# Altium PCB Sampler.PCBDOC (part 8 of 11)
Units mm, origin at the board's own origin, x right, y up, seen from the top; angles counter-clockwise.
Board outline 222.9 x 100 mm, 4 copper layers (L1, P2, L3, L4), stack 1.6 mm thick; 754 components, 442 nets, 2347 pads, 1230 vias.
Unrouted connection lines stored in the file: 10.
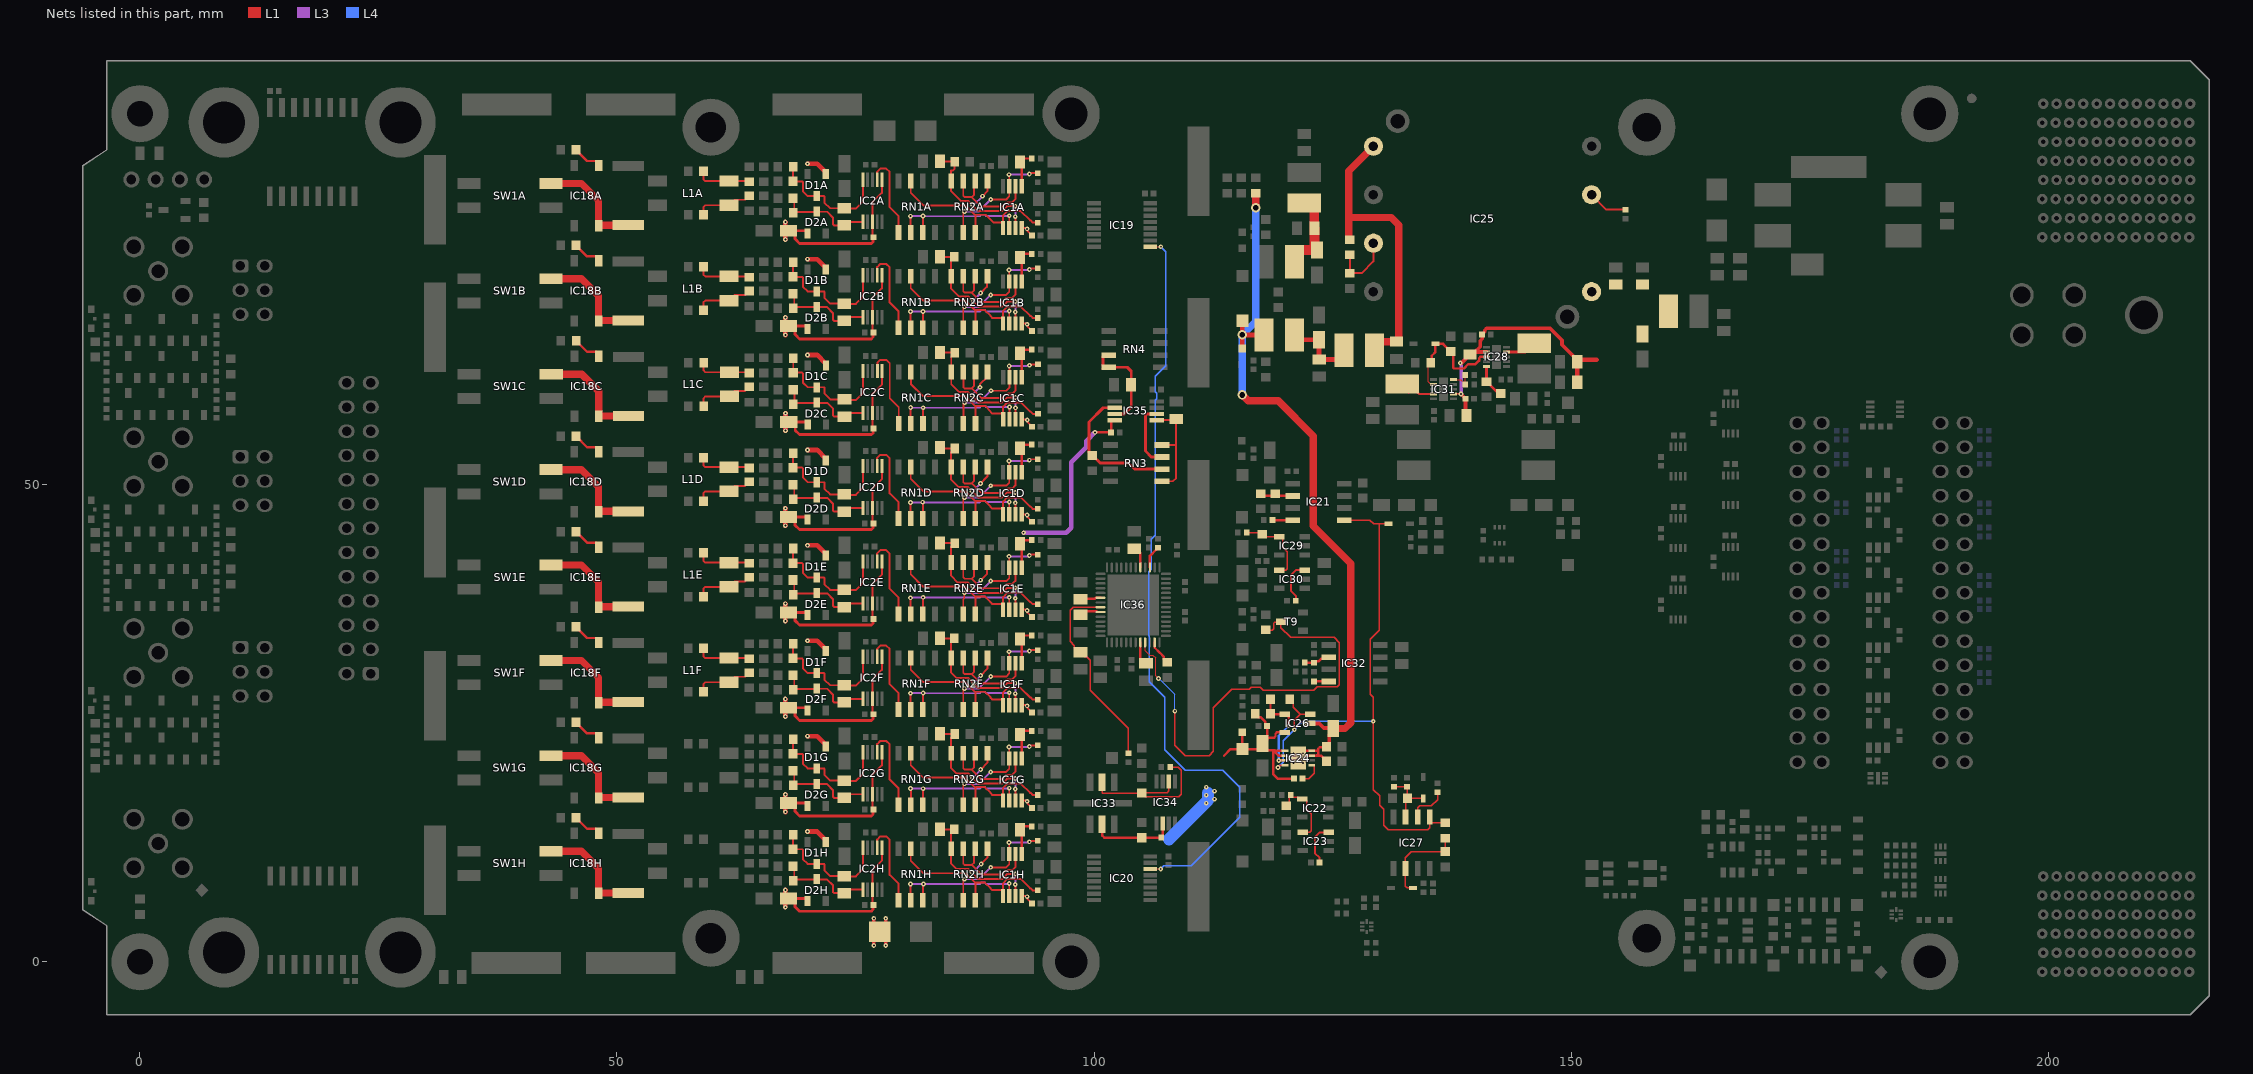
[diagram p9: the nets of this part, all layers, seen from the top]

## Via types
v1: diameter 0.5, hole 0.2, L1 to L4, tented both sides, 1208 vias
v2: diameter 1, hole 0.6, L1 to L4, tented both sides, 16 vias
v3: diameter 0.6, hole 0.3, L1 to L4, tented both sides, 6 vias

## Nets (pads, with @x,y where several pads share a name; then routed paths per layer and width w, separated by ;. In a path a pad name is that pad's centre, name@x,y a point inside that pad or via, vN(x,y) a via of type N, cw(c..) or ccw(c..) an arc to the next point about the centre after c; other vN are vias at no path point) (continued)
N12V0A: C10A.2 C10B.2 C10C.2 C10D.2 C10E.2 C10F.2 C10G.2 C10H.2 C11A.2 C11B.2 C11C.2 C11D.2 C11E.2 C11F.2 C11G.2 C11H.2 C14A.2 C14B.2 C14C.2 C14D.2 C14E.2 C14F.2 C14G.2 C14H.2 C46.2 C63.2 C64.2 C105.2 D1A.1 D1B.1 D1C.1 D1D.1 D1E.1 D1F.1 D1G.1 D1H.1 D2A.1 D2B.1 D2C.1 D2D.1 D2E.1 D2F.1 D2G.1 D2H.1 D6.2 IC1A.4 IC1B.4 IC1C.4 IC1D.4 IC1E.4 IC1F.4 IC1G.4 IC1H.4 IC2A.3 IC2A.6 IC2B.3 IC2B.6 IC2C.3 IC2C.6 IC2D.3 IC2D.6 IC2E.3 IC2E.6 IC2F.3 IC2F.6 IC2G.3 IC2G.6 IC2H.3 IC2H.6 IC24.1 IC24.2 IC26.5 IC35.4 LD12.1 R61.2 TP9.1 | length 245
  L1 w0.203: D2H.1@69.709,6.63 D2H.1@69.983,6.356 ; D2G.1@69.709,16.63 D2G.1@69.983,16.356 ; D2F.1@69.709,26.63 D2F.1@69.983,26.356 ; D2E.1@69.709,36.63 D2E.1@69.983,36.356 ; D2D.1@69.709,46.63 D2D.1@69.983,46.356 ; D2B.1@69.709,66.63 D2B.1@69.983,66.356 ; D2A.1@69.709,76.63 D2A.1@69.983,76.356 D2A.1@69.944,76.395 ; D2C.1@69.722,56.586 D2C.1@69.996,56.312 ; D1G.1@71.883,22.641 D1G.1@71.883,22.754 ; D1F.1@71.883,32.568 D1F.1@71.883,32.641 ; D1F.1@71.883,32.754 D1F.1@71.883,32.641 ; D1E.1@71.883,42.568 D1E.1@71.883,42.641 ; D1E.1@71.883,42.754 D1E.1@71.883,42.641 ; D1D.1@71.883,52.568 D1D.1@71.883,52.641 ; D1D.1@71.883,52.754 D1D.1@71.883,52.641 ; D1B.1@71.883,72.568 D1B.1@71.883,72.641 ; D1B.1@71.883,72.754 D1B.1@71.883,72.641 ; D1A.1@71.883,82.568 D1A.1@71.883,82.641 ; D1A.1@71.883,82.754 D1A.1@71.883,82.641 ; D1C.1@71.896,62.524 D1C.1@71.896,62.597 ; D1C.1@71.896,62.71 D1C.1@71.896,62.597 ; D1F.1@71.955,32.688 71.896,32.628 D1F.1@71.883,32.641 ; D1E.1@71.955,42.688 71.896,42.628 D1E.1@71.883,42.641 ; D1D.1@71.955,52.688 71.896,52.628 D1D.1@71.883,52.641 ; D1B.1@71.955,72.688 71.896,72.628 D1B.1@71.883,72.641 ; D1A.1@71.955,82.688 71.896,82.628 D1A.1@71.883,82.641 ; D1C.1@71.968,62.644 71.908,62.585 D1C.1@71.896,62.597 ; C10A.2@76.775,76.038 76.775,79.596 77.775,80.596 IC2A.6@77.775,81.967 ; C10H.2@76.865,5.948 76.775,6.038 76.775,9.596 77.775,10.596 IC2H.6@77.775,11.967 ; C10G.2@76.865,15.948 76.775,16.038 76.775,19.596 77.775,20.596 IC2G.6@77.775,21.967 ; C10F.2@76.865,25.948 76.775,26.038 76.775,29.596 77.775,30.596 IC2F.6@77.775,31.967 ; C10E.2@76.865,35.948 76.775,36.038 IC2E.3@76.775,37.567 76.775,39.596 77.775,40.596 IC2E.6@77.775,41.967 ; C10D.2@76.865,45.948 76.775,46.038 76.775,49.596 77.775,50.596 IC2D.6@77.775,51.967 ; C10B.2@76.865,65.948 76.775,66.038 76.775,69.596 77.775,70.596 IC2B.6@77.775,71.967 ; C10C.2@76.878,55.904 76.788,55.994 76.788,59.553 77.788,60.553 IC2C.6@77.788,61.923 ; IC1H.4@92.419,6.909 92.915,6.909 v1(92.994,6.83) 92.994,6.63 C14H.2@93.494,6.13 ; IC1G.4@92.419,16.909 92.915,16.909 v1(92.994,16.83) 92.994,16.63 C14G.2@93.494,16.13 ; IC1F.4@92.419,26.909 92.915,26.909 v1(92.994,26.83) 92.994,26.63 C14F.2@93.494,26.13 ; IC1E.4@92.419,36.909 92.915,36.909 v1(92.994,36.83) 92.994,36.63 C14E.2@93.494,36.13 ; IC1D.4@92.419,46.909 92.915,46.909 v1(92.994,46.83) 92.994,46.63 C14D.2@93.494,46.13 ; IC1B.4@92.419,66.909 92.915,66.909 v1(92.994,66.83) 92.994,66.63 C14B.2@93.494,66.13 ; IC1A.4@92.419,76.909 92.915,76.909 v1(92.994,76.83) 92.994,76.63 C14A.2@93.494,76.13 ; IC1C.4@92.432,56.865 92.928,56.865 v1(93.007,56.786) 93.007,56.586 C14C.2@93.507,56.086
  L1 w0.25: v1(100.1,55.5) C105.2@101.8,55.5 101.8,56.675 101.9,56.775 IC35.4@102.175,56.775 ; 113.625,21.6 114.315,22.29 TP9.1@115.55,22.29 ; LD12.1@115.55,24.075 TP9.1@115.55,22.29 ; R61.2@116.9,26.025 116.9,25.975 117.225,25.65 117.275,25.65 117.466,25.65 117.965,25.151 117.965,24.885 C64.2@118.15,24.7 C63.2@118.15,23.348 ; IC26.5@119.987,24.047 119.171,24.047 119.025,23.9 119.025,23.644 118.879,23.498 118.3,23.498 C63.2@118.15,23.348 ; IC24.2@120.012,21.61 119.571,21.61 119.569,21.612 119.338,21.612 119.05,21.9 119.05,22.054 ; IC24.1@120.012,22.11 119.106,22.11 119.05,22.054 ; C46.2@120.962,19.2 119.25,19.2 118.775,19.675 118.775,22.137 118.75,22.162 ; TP9.1@115.55,22.29 117.3,22.29 C63.2@117.8,22.79 ; C63.2@117.8,22.79 117.8,22.662 118.3,22.162 118.75,22.162 ; C63.2@117.8,22.79 117.8,22.9 118.15,23.25 C63.2@118.15,23.348 ; 118.75,22.162 118.941,22.162 119.05,22.054
  L1 w0.3: C11A.2@67.994,76.63 C11A.2@68.2,76.63 ; C11H.2@68.2,6.63 D2H.1@69.709,6.63 ; C11G.2@68.2,16.63 D2G.1@69.709,16.63 ; C11F.2@68.2,26.63 D2F.1@69.709,26.63 ; C11E.2@68.2,36.63 D2E.1@69.709,36.63 ; C11D.2@68.2,46.63 D2D.1@69.709,46.63 ; C11B.2@68.2,66.63 D2B.1@69.709,66.63 ; C11H.2@68.202,6.63 68.677,6.155 68.677,5.751 69.128,5.3 76.674,5.3 76.85,5.476 C10H.2@76.85,5.933 ; C11G.2@68.202,16.63 68.677,16.155 68.677,15.751 69.128,15.3 76.674,15.3 76.85,15.476 C10G.2@76.85,15.933 ; C11F.2@68.202,26.63 68.677,26.155 68.677,25.751 69.128,25.3 76.674,25.3 76.85,25.476 C10F.2@76.85,25.933 ; C11E.2@68.202,36.63 68.677,36.155 68.677,35.751 69.128,35.3 76.674,35.3 76.85,35.476 C10E.2@76.85,35.933 ; C11D.2@68.202,46.63 68.677,46.155 68.677,45.751 69.128,45.3 76.674,45.3 76.85,45.476 C10D.2@76.85,45.933 ; C11B.2@68.202,66.63 68.677,66.155 68.677,65.751 69.128,65.3 76.674,65.3 76.85,65.476 C10B.2@76.85,65.933 ; C11C.2@68.213,56.586 D2C.1@69.722,56.586 ; C11C.2@68.214,56.586 68.689,56.111 68.689,55.708 69.141,55.256 76.687,55.256 76.863,55.432 C10C.2@76.863,55.889 ; D2A.1@69.709,76.63 C11A.2@68.2,76.63 ; C10A.2@76.865,75.948 76.85,75.933 76.85,75.476 76.674,75.3 69.128,75.3 68.677,75.751 68.677,76.155 68.202,76.63 C11A.2@68.2,76.63
  L1 w0.35: v1(76.919,1.7) D6.2@76.919,2.605 ; D6.2@76.919,3.655 v1(76.919,4.56) ; v1(78.169,1.7) D6.2@78.169,2.605 ; D6.2@78.169,3.655 v1(78.169,4.56)
  L1 w0.5: v1(69.968,13.653) 70.984,13.653 71.883,12.754 D1H.1@71.883,12.641 ; v1(69.968,23.653) 70.984,23.653 D1G.1@71.883,22.754 ; v1(69.968,33.653) 70.984,33.653 D1F.1@71.883,32.754 ; v1(69.968,43.653) 70.984,43.653 D1E.1@71.883,42.754 ; v1(69.968,53.653) 70.984,53.653 D1D.1@71.883,52.754 ; v1(69.968,73.653) 70.984,73.653 D1B.1@71.883,72.754 ; v1(69.968,83.653) 70.984,83.653 D1A.1@71.883,82.754 ; v1(69.981,63.609) 70.997,63.609 D1C.1@71.896,62.71
  L1 w0.508: v1@67.635,7.54 v1@67.653,7.522 ; v1@67.635,15.738 v1@67.653,15.72 ; v1@67.635,17.54 v1@67.653,17.522 ; v1@67.635,25.738 v1@67.653,25.72 ; v1@67.635,27.54 v1@67.653,27.522 ; v1@67.635,35.738 v1@67.653,35.72 ; v1@67.635,37.54 v1@67.653,37.522 ; v1@67.635,45.738 v1@67.653,45.72 ; v1@67.635,47.54 v1@67.653,47.522 ; v1@67.635,65.738 v1@67.653,65.72 ; v1@67.635,67.54 v1@67.653,67.522 ; v1@67.635,75.738 v1@67.653,75.72 ; v1@67.635,77.54 v1@67.653,77.522 ; v1@67.644,5.738 67.644,6.63 v1@67.644,7.522 ; v1@67.644,15.738 67.644,16.63 v1@67.644,17.522 ; v1@67.644,25.738 67.644,26.63 v1@67.644,27.522 ; v1@67.644,35.738 67.644,36.63 v1@67.644,37.522 ; v1@67.644,45.738 67.644,46.63 v1@67.644,47.522 ; v1@67.644,65.738 67.644,66.63 v1@67.644,67.522 ; v1@67.644,75.738 67.644,76.63 v1@67.644,77.522 ; v1@67.647,55.694 v1@67.666,55.676 ; v1@67.647,57.496 v1@67.666,57.478 ; v1@67.657,55.694 67.657,56.586 v1@67.657,57.478
  L3 w0.5: v1(92.625,44.975) 97.089,44.975 97.625,45.511 97.625,52.375 99.225,53.975 99.225,54.625 v1(100.1,55.5)
  L4 w1.27: 107.85,12.85 111.95,16.95 111.95,17.7
  other v1: 67.644,5.72 67.644,7.54 67.644,15.72 111.763,16.632 112.625,17.05 111.763,17.469 67.644,17.54 112.625,17.887 111.763,18.306 67.644,25.72 67.644,27.54 67.644,35.72 67.644,37.54 67.644,45.72 67.644,47.54 67.657,55.676 67.657,57.496 67.644,65.72 67.644,67.54 67.644,75.72 67.644,77.54
N13V0: C26.2 C61.2 C62.2 IC24.7 IC24.8 IC24.9 IC26.2 L6.2 LD13.1 R42.2 TP20.1 | length 80.4
  L1 w0.25: IC24.9@122.114,21.61 IC24.7@122.812,21.61 123.335,21.61 ; IC24.9@122.114,22.11 IC24.8@122.812,22.11 123.51,22.11 ; C26.2@124.378,21.01 124.378,21.035 123.803,21.61 123.335,21.61 ; C61.2@124.378,22.535 124.343,22.5 123.675,22.5 123.51,22.335 123.51,22.11 ; 123.335,21.61 123.51,21.785 123.51,22.11
  L1 w0.4: IC26.2@122.687,24.997 123.615,24.997 124.087,24.525 124.653,24.525 124.777,24.401 124.777,24.159 C62.2@125.078,24.46 125.078,24.185 124.652,23.759 124.652,22.809 C61.2@124.378,22.535
  L1 w0.5: LD13.1@115.55,64.285 v2(115.55,65.725) TP20.1@115.55,66.895
  L1 w0.508: v2(115.55,65.725) 115.575,65.7 L6.2@117.7,65.7
  L1 w0.762: v2(115.55,59.425) 116.176,58.799 119.302,58.799 122.981,55.12 122.981,45.684 126.905,41.76 126.905,25.055 126.31,24.46 C62.2@125.078,24.46 ; R42.2@116.944,80.58 116.944,79.081 v2@116.975,79.05
  L4 w0.762: v2(115.55,59.425) v2(115.55,65.725) 116.944,67.119 v2(116.944,79.055)
  other v1: 120.912,20.86 121.912,20.86 120.912,21.86 121.912,21.86
N13V0S: C58.2 IC25.4 L5.1 R58.1 | length 32
  L1 w0.762: R58.1@126.694,75.68 R58.1@126.738,75.724 ; R58.1@126.813,75.699 126.763,75.699 R58.1@126.738,75.724 ; R58.1@126.813,75.749 126.763,75.749 R58.1@126.738,75.724 ; IC25.4@129.294,85.485 126.694,82.885 126.694,78.33 ; L5.1@129.4,64.1 129.4,64.381 130.019,65 C58.2@131.7,65 131.944,65.244 131.944,77.235 131.149,78.03 126.994,78.03 126.694,78.33 ; 126.694,78.33 126.694,75.768 R58.1@126.738,75.724
NetC1A_2: C1A.2 C2A.2 D1A.3 IC2A.10 R3A.2 | length 13.5
  L1 w0.203: R3A.2@68.462,83.322 C1A.2@68.462,81.798 69.403,81.798 69.483,81.718 69.483,80.768 69.983,80.268 D1A.3@70.933,80.268 71.702,80.268 71.746,80.224 71.746,79.589 72.345,78.99 C2A.2@73.829,78.99 73.865,78.954 75.048,78.954 75.775,79.681 IC2A.10@75.775,81.967
NetC1B_2: C1B.2 C2B.2 D1B.3 IC2B.10 R3B.2 | length 13.5
  L1 w0.203: R3B.2@68.462,73.322 C1B.2@68.462,71.798 69.403,71.798 69.483,71.718 69.483,70.768 69.983,70.268 D1B.3@70.933,70.268 71.702,70.268 71.746,70.224 71.746,69.589 72.345,68.99 C2B.2@73.829,68.99 73.865,68.954 75.048,68.954 75.775,69.681 IC2B.10@75.775,71.967
NetC1C_2: C1C.2 C2C.2 D1C.3 IC2C.10 R3C.2 | length 13.5
  L1 w0.203: R3C.2@68.475,63.278 C1C.2@68.475,61.754 69.416,61.754 69.496,61.674 69.496,60.724 69.996,60.224 D1C.3@70.946,60.224 71.715,60.224 71.759,60.18 71.759,59.545 72.357,58.947 C2C.2@73.841,58.947 73.878,58.91 75.061,58.91 75.788,59.637 IC2C.10@75.788,61.923
NetC1D_2: C1D.2 C2D.2 D1D.3 IC2D.10 R3D.2 | length 13.5
  L1 w0.203: R3D.2@68.462,53.322 C1D.2@68.462,51.798 69.403,51.798 69.483,51.718 69.483,50.768 69.983,50.268 D1D.3@70.933,50.268 71.702,50.268 71.746,50.224 71.746,49.589 72.345,48.99 C2D.2@73.829,48.99 73.865,48.954 75.048,48.954 75.775,49.681 IC2D.10@75.775,51.967
NetC1E_2: C1E.2 C2E.2 D1E.3 IC2E.10 R3E.2 | length 13.5
  L1 w0.203: R3E.2@68.462,43.322 C1E.2@68.462,41.798 69.403,41.798 69.483,41.718 69.483,40.768 69.983,40.268 D1E.3@70.933,40.268 71.702,40.268 71.746,40.224 71.746,39.589 72.345,38.99 C2E.2@73.829,38.99 73.865,38.954 75.048,38.954 75.775,39.681 IC2E.10@75.775,41.967
NetC1F_2: C1F.2 C2F.2 D1F.3 IC2F.10 R3F.2 | length 13.5
  L1 w0.203: R3F.2@68.462,33.322 C1F.2@68.462,31.798 69.403,31.798 69.483,31.718 69.483,30.768 69.983,30.268 D1F.3@70.933,30.268 71.702,30.268 71.746,30.224 71.746,29.589 72.345,28.99 C2F.2@73.829,28.99 73.865,28.954 75.048,28.954 75.775,29.681 IC2F.10@75.775,31.967
NetC1G_2: C1G.2 C2G.2 D1G.3 IC2G.10 R3G.2 | length 13.5
  L1 w0.203: R3G.2@68.462,23.322 C1G.2@68.462,21.798 69.403,21.798 69.483,21.718 69.483,20.768 69.983,20.268 D1G.3@70.933,20.268 71.702,20.268 71.746,20.224 71.746,19.589 72.345,18.99 C2G.2@73.829,18.99 73.865,18.954 75.048,18.954 75.775,19.681 IC2G.10@75.775,21.967
NetC1H_2: C1H.2 C2H.2 D1H.3 IC2H.10 R3H.2 | length 13.5
  L1 w0.203: R3H.2@68.462,13.322 C1H.2@68.462,11.798 69.403,11.798 69.483,11.718 69.483,10.768 69.983,10.268 D1H.3@70.933,10.268 71.702,10.268 71.746,10.224 71.746,9.589 72.345,8.99 C2H.2@73.829,8.99 73.865,8.954 75.048,8.954 75.775,9.681 IC2H.10@75.775,11.967
NetC2A_1: C2A.1 C5A.2 D2A.3 IC2A.1 R10A.2 | length 9.7
  L1 w0.203: C5A.2@68.582,79.9 68.582,78.616 70.893,78.616 D2A.3@70.899,78.622 ; D2A.3@70.933,78.656 D2A.3@70.899,78.622 ; IC2A.1@75.775,77.567 74.205,77.567 C2A.1@73.829,77.19 72.749,77.19 72.642,77.298 72.642,78.004 72.024,78.622 D2A.3@70.899,78.622
NetC2B_1: C2B.1 C5B.2 D2B.3 IC2B.1 R10B.2 | length 9.7
  L1 w0.203: C5B.2@68.582,69.9 68.582,68.616 70.893,68.616 D2B.3@70.899,68.622 ; D2B.3@70.933,68.656 D2B.3@70.899,68.622 ; IC2B.1@75.775,67.567 74.205,67.567 C2B.1@73.829,67.19 72.749,67.19 72.642,67.298 72.642,68.004 72.024,68.622 D2B.3@70.899,68.622
NetC2C_1: C2C.1 C5C.2 D2C.3 IC2C.1 R10C.2 | length 9.7
  L1 w0.203: C5C.2@68.595,59.856 68.595,58.572 70.906,58.572 D2C.3@70.912,58.578 ; D2C.3@70.946,58.612 D2C.3@70.912,58.578 ; IC2C.1@75.788,57.523 74.218,57.523 C2C.1@73.841,57.147 72.762,57.147 72.654,57.254 72.654,57.96 72.036,58.578 D2C.3@70.912,58.578
NetC2D_1: C2D.1 C5D.2 D2D.3 IC2D.1 R10D.2 | length 9.7
  L1 w0.203: C5D.2@68.582,49.9 68.582,48.616 70.893,48.616 D2D.3@70.899,48.622 ; D2D.3@70.933,48.656 D2D.3@70.899,48.622 ; IC2D.1@75.775,47.567 74.205,47.567 C2D.1@73.829,47.19 72.749,47.19 72.642,47.298 72.642,48.004 72.024,48.622 D2D.3@70.899,48.622
NetC2E_1: C2E.1 C5E.2 D2E.3 IC2E.1 R10E.2 | length 9.7
  L1 w0.203: C5E.2@68.582,39.9 68.582,38.616 70.893,38.616 D2E.3@70.899,38.622 ; D2E.3@70.933,38.656 D2E.3@70.899,38.622 ; IC2E.1@75.775,37.567 74.205,37.567 C2E.1@73.829,37.19 72.749,37.19 72.642,37.298 72.642,38.004 72.024,38.622 D2E.3@70.899,38.622
NetC2F_1: C2F.1 C5F.2 D2F.3 IC2F.1 R10F.2 | length 9.7
  L1 w0.203: C5F.2@68.582,29.9 68.582,28.616 70.893,28.616 D2F.3@70.899,28.622 ; D2F.3@70.933,28.656 D2F.3@70.899,28.622 ; IC2F.1@75.775,27.567 74.205,27.567 C2F.1@73.829,27.19 72.749,27.19 72.642,27.298 72.642,28.004 72.024,28.622 D2F.3@70.899,28.622
NetC2G_1: C2G.1 C5G.2 D2G.3 IC2G.1 R10G.2 | length 9.7
  L1 w0.203: C5G.2@68.582,19.9 68.582,18.616 70.893,18.616 D2G.3@70.899,18.622 ; D2G.3@70.933,18.656 D2G.3@70.899,18.622 ; IC2G.1@75.775,17.567 74.205,17.567 C2G.1@73.829,17.19 72.749,17.19 72.642,17.298 72.642,18.004 72.024,18.622 D2G.3@70.899,18.622
NetC2H_1: C2H.1 C5H.2 D2H.3 IC2H.1 R10H.2 | length 9.7
  L1 w0.203: C5H.2@68.582,9.9 68.582,8.616 70.893,8.616 D2H.3@70.899,8.622 ; D2H.3@70.933,8.656 D2H.3@70.899,8.622 ; IC2H.1@75.775,7.567 74.205,7.567 C2H.1@73.829,7.19 72.749,7.19 72.642,7.298 72.642,8.004 72.024,8.622 D2H.3@70.899,8.622
NetC3A_2: C3A.2 IC1A.3 R7A.2 RN2A.1 RN2A.4 | length 18.6
  L1 w0.203: C3A.2@83.869,83.655 C3A.2@83.869,83.905 85.369,83.905 R7A.2@85.394,83.88 85.394,83.105 85.239,82.95 85.024,82.95 RN2A.4@85.024,81.855 85.024,80.775 86.044,79.755 86.794,79.755 v1@87.194,79.355 ; v1(87.244,79.355) v1@87.194,79.355 ; v1(88.319,80.255) 88.834,80.77 RN2A.1@88.834,81.855 ; v1(91.744,79.205) 90.894,79.205 90.369,78.68 87.869,78.68 v1@87.194,79.355 ; v1(91.748,78.109) 91.769,78.088 IC1A.3@91.769,76.909
  L3 w0.203: v1(87.244,79.355) 87.419,79.355 v1(88.319,80.255) ; v1(91.744,79.205) 91.748,79.201 v1(91.748,78.109)
NetC3B_2: C3B.2 IC1B.3 R7B.2 RN2B.1 RN2B.4 | length 18.2
  L1 w0.203: C3B.2@83.869,73.905 83.894,73.88 85.344,73.88 85.024,73.56 RN2B.4@85.024,71.855 85.024,70.555 85.824,69.755 86.794,69.755 v1(87.332,69.217) 87.869,68.68 90.369,68.68 90.894,69.205 v1(91.744,69.205) ; v1(88.119,70.105) 88.769,70.755 88.769,71.79 RN2B.1@88.834,71.855 ; v1(91.748,68.109) 91.769,68.088 IC1B.3@91.769,66.909
  L3 w0.203: v1(87.332,69.217) 87.332,69.318 v1(88.119,70.105) ; v1(91.744,69.205) 91.748,69.201 v1(91.748,68.109)
NetC3C_2: C3C.2 IC1C.3 R7C.2 RN2C.1 RN2C.4 | length 18.1
  L1 w0.203: C3C.2@83.882,63.861 83.888,63.855 R7C.2@85.394,63.855 85.037,63.498 RN2C.4@85.037,61.812 85.037,60.53 85.856,59.711 86.807,59.711 87.166,59.352 87.882,58.636 90.382,58.636 90.907,59.161 v1(91.757,59.161) ; v1(88.044,60.23) 88.044,60.53 88.847,61.333 RN2C.1@88.847,61.812 ; v1(91.761,58.065) 91.782,58.045 IC1C.3@91.782,56.865
  L3 w0.203: v1(87.194,59.38) v1(88.044,60.23) ; v1(91.757,59.161) 91.761,59.157 v1(91.761,58.065)
NetC3D_2: C3D.2 IC1D.3 R7D.2 RN2D.1 RN2D.4 | length 18.2
  L1 w0.203: C3D.2@83.869,53.905 83.969,53.805 R7D.2@85.394,53.805 85.024,53.435 RN2D.4@85.024,51.855 85.024,50.546 85.816,49.755 86.794,49.755 v1(87.219,49.33) 87.869,48.68 90.369,48.68 90.894,49.205 v1(91.744,49.205) ; v1(88.094,50.13) 88.834,50.87 RN2D.1@88.834,51.855 ; v1(91.748,48.109) 91.769,48.088 IC1D.3@91.769,46.909
  L3 w0.203: v1(87.219,49.33) 87.294,49.33 v1(88.094,50.13) ; v1(91.744,49.205) 91.748,49.201 v1(91.748,48.109)
NetC3E_2: C3E.2 IC1E.3 R7E.2 RN2E.1 RN2E.4 | length 18.3
  L1 w0.203: C3E.2@83.869,43.905 83.894,43.88 R7E.2@85.394,43.88 85.024,43.51 RN2E.4@85.024,41.855 85.024,40.467 85.737,39.755 86.794,39.755 87.257,39.292 87.869,38.68 90.369,38.68 90.894,39.205 v1(91.744,39.205) ; v1(88.119,40.005) 88.794,40.68 88.794,41.815 RN2E.1@88.834,41.855 ; v1(91.748,38.109) 91.769,38.088 IC1E.3@91.769,36.909
  L3 w0.203: v1(87.294,39.33) 87.444,39.33 v1(88.119,40.005) ; v1(91.744,39.205) 91.748,39.201 v1(91.748,38.109)
NetC3F_2: C3F.2 IC1F.3 R7F.2 RN2F.1 RN2F.4 | length 18.4
  L1 w0.203: C3F.2@83.869,33.905 R7F.2@85.369,33.905 85.024,33.56 RN2F.4@85.024,31.855 85.024,30.3 85.569,29.755 86.794,29.755 87.412,29.137 87.869,28.68 90.369,28.68 90.894,29.205 v1(91.744,29.205) ; v1(88.119,30.005) 88.834,30.72 RN2F.1@88.834,31.855 ; v1(91.748,28.109) 91.769,28.088 IC1F.3@91.769,26.909
  L3 w0.203: v1(87.429,29.155) 87.429,29.315 v1(88.119,30.005) ; v1(91.744,29.205) 91.748,29.201 v1(91.748,28.109)
NetC3G_2: C3G.2 IC1G.3 R7G.2 RN2G.1 RN2G.4 | length 18.4
  L1 w0.203: C3G.2@83.869,23.905 83.894,23.88 R7G.2@85.394,23.88 85.024,23.51 RN2G.4@85.024,21.855 85.024,20.3 85.569,19.755 86.794,19.755 v1(87.244,19.305) 87.869,18.68 90.369,18.68 90.894,19.205 v1(91.744,19.205) ; v1(88.119,20.155) 88.834,20.87 RN2G.1@88.834,21.855 ; v1(91.748,18.109) 91.769,18.088 IC1G.3@91.769,16.909
  L3 w0.203: v1(87.244,19.305) 87.269,19.305 v1(88.119,20.155) ; v1(91.744,19.205) 91.748,19.201 v1(91.748,18.109)
NetC3H_2: C3H.2 IC1H.3 R7H.2 RN2H.1 RN2H.4 | length 18.3
  L1 w0.203: C3H.2@83.894,13.88 R7H.2@85.369,13.88 85.024,13.535 RN2H.4@85.024,11.855 85.024,10.3 85.569,9.755 86.794,9.755 87.169,9.38 87.869,8.68 90.369,8.68 90.894,9.205 v1(91.744,9.205) ; v1(88.169,10.255) 88.834,10.92 RN2H.1@88.834,11.855 ; v1(91.748,8.109) 91.769,8.088 IC1H.3@91.769,6.909
  L3 w0.203: v1(87.194,9.405) 87.319,9.405 v1(88.169,10.255) ; v1(91.744,9.205) 91.748,9.201 v1(91.748,8.109)
NetC12A_2: C12A.2 IC1A.5 R13A.2 | length 4
  L1 w0.254: IC1A.5@92.419,81.309 92.419,83.655 C12A.2@92.244,83.83 92.619,84.205 R13A.2@93.474,84.205
NetC12B_2: C12B.2 IC1B.5 R13B.2 | length 4
  L1 w0.254: IC1B.5@92.419,71.309 92.419,73.655 C12B.2@92.244,73.83 92.619,74.205 R13B.2@93.474,74.205
NetC12C_2: C12C.2 IC1C.5 R13C.2 | length 4
  L1 w0.254: IC1C.5@92.432,61.265 92.432,63.611 C12C.2@92.257,63.786 92.632,64.161 R13C.2@93.487,64.161
NetC12D_2: C12D.2 IC1D.5 R13D.2 | length 4
  L1 w0.254: IC1D.5@92.419,51.309 92.419,53.655 C12D.2@92.244,53.83 92.619,54.205 R13D.2@93.474,54.205
NetC12E_2: C12E.2 IC1E.5 R13E.2 | length 4
  L1 w0.254: IC1E.5@92.419,41.309 92.419,43.655 C12E.2@92.244,43.83 92.619,44.205 R13E.2@93.474,44.205
NetC12F_2: C12F.2 IC1F.5 R13F.2 | length 4
  L1 w0.254: IC1F.5@92.419,31.309 92.419,33.655 C12F.2@92.244,33.83 92.619,34.205 R13F.2@93.474,34.205
NetC12G_2: C12G.2 IC1G.5 R13G.2 | length 4
  L1 w0.254: IC1G.5@92.419,21.309 92.419,23.655 C12G.2@92.244,23.83 92.619,24.205 R13G.2@93.474,24.205
NetC12H_2: C12H.2 IC1H.5 R13H.2 | length 4
  L1 w0.254: IC1H.5@92.419,11.309 92.419,13.655 C12H.2@92.244,13.83 92.619,14.205 R13H.2@93.474,14.205
NetC40_2: C40.2 IC21.4 | length 2.1
  L1 w0.25: C40.2@118.693,46.298 IC21.4@120.834,46.298
NetC42_1: C42.1 IC23.3 | length 4.6
  L1 w0.203: C42.1@123.644,10.369 123.644,10.885 123.144,11.385 123.144,13.069 123.644,13.569 IC23.3@124.594,13.569
NetC46_1: C46.1 IC24.5 | length 2.5
  L1 w0.152: C46.1@121.862,19.2 122.5,19.2 123.082,19.783 123.082,20.561 123.034,20.61 IC24.5@122.812,20.61
NetC49_2: C49.2 C50.1 L2.2 L3.1 | length 9
  L1 w1.016: L3.1@121,73.4 121,74.114 121.492,74.606 C50.1@123.387,74.606 123.387,74.881 123.111,75.157 123.111,76.863 C49.2@123.094,76.88 123.094,79.038 122.602,79.53 L2.2@122.144,79.53
NetC52_1: C52.1 C53.2 C54.2 C55.2 C56.2 C73.2 C74.2 C85.2 C86.2 IC25.1 IC28.2 IC31.2 L4.2 | length 29.1
  L1 w0.152: IC31.2@137.691,59.52 v1(138.481,59.52)
  L1 w0.381: v1(138.391,62.77) 138.523,62.77 C74.2@139.409,63.655 139.645,63.655 C74.2@139.904,63.915 ; v1(138.481,59.52) 138.481,59.48 C85.2@138.941,59.02 138.941,57.37 C86.2@139.041,57.27 ; IC28.2@141.142,63.915 C74.2@139.904,63.915 ; C55.2@150.653,62.901 150.653,63.076 149.06,64.669 149.06,65.139 147.802,66.397 141.149,66.397 140.963,66.211 140.963,66.042 C73.2@140.691,65.77 140.691,65.295 140.475,65.079 140.475,64.486 C74.2@139.904,63.915 ; L4.2@160.1,68.3 L4.2@160.2,68.2
  L1 w0.508: C56.2@150.653,60.742 C55.2@150.653,62.901 150.865,63.113 152.66,63.113
  L1 w0.762: IC25.1@152.154,70.245 IC25.1@152.489,70.245 ; C52.1@157.5,65.8 C52.1@157.5,66.075
  L3 w0.381: v1(138.391,62.77) 138.391,62.737 138.481,62.647 v1(138.481,59.52)
NetC59_2: C59.2 C60.2 L5.2 L6.1 | length 8.3
  L1 w0.508: L6.1@121,65.7 121,65.696 L6.1@121.746,64.95 ; L6.1@121.746,65.2 C60.2@123.6,65.2 C59.2@123.6,63.15 L5.2@125.454,63.15 ; L5.2@125.454,62.9 126.2,63.646 L5.2@126.2,64.1
NetC65_2: C65.2 D7.2 IC27.3 R59.1 R62.2 | length 6.3
  L1 w0.152: R59.1@131.425,18.35 R62.2@132.825,18.35 132.825,17.175 C65.2@132.875,17.125 ; IC27.3@132.651,15.192 132.651,16.901 C65.2@132.875,17.125 ; D7.2@134.511,17.102 134.488,17.125 C65.2@132.875,17.125
NetC66_2: C66.2 D8.2 IC28.3 IC31.7 R64.1 | length 13.1
  L1 w0.127: R64.1@135.291,62.795 135.316,62.77 135.378,62.77 135.441,62.77 135.378,62.707 135.05,62.379 135.05,60.791 135.235,60.606 135.504,60.606 IC31.7@135.591,60.52
  L1 w0.254: R64.1@135.291,62.795 135.353,62.857 135.398,62.902 135.398,63.527 135.788,63.917 135.788,64.763 D8.2@135.781,64.77 ; D8.2@135.788,64.77 136.591,64.77 C66.2@137.391,63.97 137.641,63.72 137.641,62.27 137.718,62.193 138.776,62.193 139.233,62.649 139.987,62.649 140.363,63.025 140.363,63.27 140.508,63.415 IC28.3@141.142,63.415
NetC72_2: C72.2 D9.2 IC27.6 R67.1 | length 9.7
  L1 w0.152: D9.2@133.426,7.742 132.833,7.742 132.65,7.925 132.65,10.925 133.275,11.55 C72.2@136.825,11.55 R67.1@136.825,12.967
NetC75_1: C75.1 IC30.3 | length 4.6
  L1 w0.203: C75.1@121.15,37.85 121.15,38.367 120.65,38.867 120.65,40.55 121.15,41.05 IC30.3@122.1,41.05
NetC82_2: C82.2 IC32.4 | length 1.5
  L1 w0.25: C82.2@123.046,29.389 IC32.4@124.596,29.389
NetC95_2: C95.2 IC36.22 | length 2.5
  L1 w0.254: IC36.22@104.864,33.49 104.864,31.703 105.287,31.28 C95.2@105.444,31.28
NetC96_2: C96.2 IC36.9 | length 2.3
  L1 w0.254: C96.2@98.569,36.366 98.964,36.761 100.248,36.761 100.344,36.665 IC36.9@100.689,36.665
NetC97_2: C97.2 IC36.6 | length 2.2
  L1 w0.254: C97.2@98.569,37.995 98.635,38.062 100.06,38.062 100.164,38.165 IC36.6@100.689,38.165
NetC98_2: C98.2 IC36.45 | length 2.2
  L1 w0.254: C98.2@104.415,43.321 104.864,42.871 IC36.45@104.864,41.34
NetC99_2: C99.2 IC36.8 R81.2 | length 21.1
  L1 w0.152: C99.2@98.569,32.442 99.043,31.968 99.232,31.968 99.591,31.609 99.591,28.484 103.6,24.475 R81.2@103.6,21.87 ; C99.2@98.65,32.525 98.345,32.525 97.954,32.916 97.954,33.121 97.493,33.582 97.493,36.853 97.806,37.165 IC36.8@100.689,37.165
NetC101_2: C101.2 IC33.2 IC34.2 R80.2 | length 9.2
  L1 w0.127: R80.2@107.194,13.093 107.114,13.013 R80.2@107.262,13.013
  L1 w0.25: IC33.2@100.844,14.434 100.844,13.24 101.071,13.013 R80.2@107.051,13.013 R80.2@107.114,13.013 ; R80.2@107.194,13.093 IC34.2@107.194,14.505
NetC102_2: C102.2 IC33.6 IC34.6 R82.1 | length 17.6
  L1 w0.152: IC33.6@100.844,18.834 100.844,17.745 100.933,17.656 104.939,17.656 C102.2@104.983,17.7 ; IC34.6@107.844,18.905 107.844,17.929 107.655,17.74 105.023,17.74 C102.2@104.983,17.7 ; R82.1@107.844,20.262 R82.1@107.991,20.409 108.816,20.409 109.125,20.1 109.125,17.55 108.876,17.301 105.382,17.301 105.045,17.638 C102.2@104.983,17.7
NetC103_2: C103.2 IC35.5 RN3.5 RN3.8 | length 11.2
  L1 w0.203: IC35.5@106.575,56.775 108.386,56.775 C103.2@108.611,57 ; RN3.5@107.125,50.37 108.272,50.37 108.611,50.709 108.611,54.18 ; RN3.8@107.125,54.18 108.611,54.18 ; C103.2@108.611,56.639 108.611,54.18
NetC106_2: C106.2 IC35.3 RN4.3 RN4.4 | length 10.8
  L1 w0.3: RN4.4@100.931,62.17 101.081,62.32 RN4.4@101.083,62.32 ; RN4.3@101.55,63.59 101.083,63.59 100.933,63.44 100.933,62.47 RN4.4@101.083,62.32 ; IC35.3@102.175,57.425 103.175,57.425 103.9,58.15 C106.2@103.9,60.5 103.9,61.9 103.48,62.32 RN4.4@101.55,62.32 RN4.4@101.083,62.32
NetD10_2: D10.2 IC21.5 IC24.4 IC26.3 IC27.1 R53.1 R67.2 | length 64.5
  L1 w0.152: v1(119.282,20.382) 119.51,20.61 IC24.4@120.012,20.61 ; R53.1@120.537,27.5 120.888,27.149 120.888,26.676 121.618,25.947 ; v1(121,24.322) 121,25.329 121.618,25.947 ; IC26.3@122.687,25.947 121.618,25.947 ; IC21.5@126.234,46.298 128.902,46.298 129.3,45.9 129.889,45.9 ; D10.2@130.86,45.9 129.889,45.9 ; IC27.1@135.191,15.36 IC27.1@135.191,15.192 IC27.1@135.191,14.791 ; R67.2@136.825,14.567 135.415,14.567 IC27.1@135.191,14.791 ; 129.889,45.9 129.889,34.739 128.975,33.825 128.975,28.05 129.274,27.751 v1(129.274,25.215) 129.274,18.057 129.949,17.383 129.949,16.426 130.375,16 130.375,14.3 130.818,13.857 135.007,13.857 135.191,14.041 IC27.1@135.191,14.791
  L4 w0.152: v1(119.282,20.382) 119.825,20.925 119.825,23.147 v1(121,24.322) 121.893,25.215 v1(129.274,25.215)
NetIC1A_1: IC1A.1 R6A.1 RN1A.7 RN2A.7 | length 19.7
  L1 w0.203: RN1A.7@80.788,81.857 80.788,80.611 82.105,79.294 86.541,79.294 87.564,78.27 ; RN2A.7@87.564,76.455 87.564,78.27 ; IC1A.1@90.469,76.909 IC1A.1@90.469,77.506 ; R6A.1@94.103,77.486 93.573,77.486 93.353,77.706 93.293,77.706 92.315,78.684 90.921,78.684 90.469,78.232 IC1A.1@90.469,77.506 ; 87.564,78.27 87.603,78.309 88.634,78.309 89.437,77.506 IC1A.1@90.469,77.506
NetIC1A_2: IC1A.2 RN1A.2 RN1A.3 | length 15.2
  L1 w0.203: v1(80.769,78.155) 80.769,76.477 RN1A.2@80.788,76.457 ; RN1A.3@82.058,76.457 82.058,78.169 v1(82.069,78.18) ; IC1A.2@91.119,76.909 v1(91.119,78.205)
  L3 w0.203: v1(80.769,78.155) 82.069,78.155 82.073,78.151 88.014,78.151 88.171,78.309 88.567,78.309 88.699,78.177 91.091,78.177 v1(91.119,78.205)
NetIC1A_6: IC1A.6 RN2A.2 RN2A.3 | length 11.1
  L1 w0.203: RN2A.3@86.294,81.855 86.294,80.29 86.429,80.155 87.179,80.155 ; RN2A.2@87.564,81.855 87.429,81.72 87.429,80.405 87.179,80.155 ; IC1A.6@91.769,81.309 91.769,79.934 91.444,79.609 90.965,79.609 90.891,79.535 90.757,79.535 90.377,79.155 88.179,79.155 87.179,80.155
NetIC1A_7: IC1A.7 R12A.1 RN2A.6 | length 13
  L1 w0.203: RN2A.6@86.294,76.455 86.294,78.52 v1(86.429,78.655) ; v1(89.179,79.905) 90.794,79.905 91.119,80.23 IC1A.7@91.119,81.309 91.119,82.48 v1(91.094,82.505) ; v1(93.219,82.58) 93.315,82.676 R12A.1@94.103,82.676
  L3 w0.203: v1(86.429,78.655) 87.929,78.655 v1(89.179,79.905) ; v1(91.094,82.505) 93.144,82.505 v1(93.219,82.58)
NetIC1B_1: IC1B.1 R6B.1 RN1B.7 RN2B.7 | length 19.7
  L1 w0.203: RN1B.7@80.788,71.857 80.788,70.611 82.069,69.33 86.505,69.33 87.564,68.27 ; RN2B.7@87.564,66.455 87.564,68.27 ; IC1B.1@90.469,66.909 IC1B.1@90.469,67.506 ; R6B.1@94.103,67.486 93.573,67.486 93.353,67.706 93.293,67.706 92.315,68.684 90.921,68.684 90.469,68.232 IC1B.1@90.469,67.506 ; 87.564,68.27 87.603,68.309 88.567,68.309 89.165,67.711 89.165,67.67 89.329,67.506 IC1B.1@90.469,67.506
NetIC1B_2: IC1B.2 RN1B.2 RN1B.3 | length 15.2
  L1 w0.203: v1(80.769,68.155) 80.769,66.477 RN1B.2@80.788,66.457 ; RN1B.3@82.058,66.457 82.058,68.169 v1(82.069,68.18) ; IC1B.2@91.119,66.909 v1(91.119,68.205)
  L3 w0.203: v1(80.769,68.155) 82.5,68.155 82.503,68.151 88.014,68.151 88.171,68.309 88.567,68.309 88.699,68.177 91.091,68.177 v1(91.119,68.205)
NetIC1B_6: IC1B.6 RN2B.2 RN2B.3 | length 11.1
  L1 w0.203: RN2B.3@86.294,71.855 86.294,70.29 86.429,70.155 87.179,70.155 ; RN2B.2@87.564,71.855 87.429,71.72 87.429,70.405 87.179,70.155 ; IC1B.6@91.769,71.309 91.769,69.934 91.444,69.609 90.965,69.609 90.891,69.535 90.757,69.535 90.377,69.155 88.179,69.155 87.179,70.155
NetIC1B_7: IC1B.7 R12B.1 RN2B.6 | length 13
  L1 w0.203: RN2B.6@86.294,66.455 86.294,68.52 v1(86.429,68.655) ; v1(89.179,69.905) 90.794,69.905 91.119,70.23 91.119,72.48 v1(91.094,72.505) ; v1(93.219,72.58) 93.315,72.676 R12B.1@94.103,72.676
  L3 w0.203: v1(86.429,68.655) 87.929,68.655 v1(89.179,69.905) ; v1(91.094,72.505) 93.144,72.505 v1(93.219,72.58)
NetIC1C_1: IC1C.1 R6C.1 RN1C.7 RN2C.7 | length 19.7
  L1 w0.203: RN1C.7@80.801,61.813 80.801,60.567 82.077,59.291 86.513,59.291 87.577,58.227 ; RN2C.7@87.577,56.412 87.577,58.227 ; IC1C.1@90.482,56.865 IC1C.1@90.482,57.462 ; R6C.1@94.116,57.442 93.586,57.442 93.366,57.662 93.305,57.662 92.328,58.64 90.933,58.64 90.482,58.188 IC1C.1@90.482,57.462 ; 87.577,58.227 87.615,58.265 88.58,58.265 89.177,57.667 89.177,57.626 89.341,57.462 IC1C.1@90.482,57.462
NetIC1C_2: IC1C.2 RN1C.2 RN1C.3 | length 15.2
  L1 w0.203: v1(80.782,58.111) 80.782,56.433 RN1C.2@80.801,56.413 ; RN1C.3@82.071,56.413 82.071,58.057 v1(82.094,58.08) ; IC1C.2@91.132,56.865 v1(91.132,58.161)
  L3 w0.203: v1(80.782,58.111) 80.813,58.08 87.998,58.08 88.183,58.265 88.58,58.265 88.712,58.133 91.103,58.133 v1(91.132,58.161)
NetIC1C_6: IC1C.6 RN2C.2 RN2C.3 | length 11.1
  L1 w0.203: RN2C.3@86.307,61.812 86.307,60.247 86.442,60.112 87.192,60.112 ; RN2C.2@87.577,61.812 87.442,61.677 87.442,60.362 87.192,60.112 ; IC1C.6@91.782,61.265 91.782,59.89 91.457,59.565 90.977,59.565 90.904,59.491 90.77,59.491 90.39,59.112 88.192,59.112 87.192,60.112
NetIC1C_7: IC1C.7 R12C.1 RN2C.6 | length 13
  L1 w0.203: RN2C.6@86.307,56.412 86.307,58.477 v1(86.442,58.612) ; v1(89.192,59.862) 90.807,59.862 91.132,60.186 IC1C.7@91.132,61.265 91.132,62.436 v1(91.107,62.461) ; v1(93.232,62.536) 93.328,62.632 R12C.1@94.116,62.632
  L3 w0.203: v1(86.442,58.612) 87.942,58.612 v1(89.192,59.862) ; v1(91.107,62.461) 93.157,62.461 v1(93.232,62.536)
NetIC1D_1: IC1D.1 R6D.1 RN1D.7 RN2D.7 | length 19.7
  L1 w0.203: RN1D.7@80.788,51.857 80.788,50.611 82.099,49.3 86.535,49.3 87.564,48.27 ; RN2D.7@87.564,46.455 87.564,48.27 ; IC1D.1@90.469,46.909 IC1D.1@90.469,47.506 ; R6D.1@94.103,47.486 93.573,47.486 93.353,47.706 93.293,47.706 92.315,48.684 90.921,48.684 90.469,48.232 IC1D.1@90.469,47.506 ; 87.564,48.27 87.603,48.309 88.567,48.309 89.165,47.711 89.165,47.67 89.329,47.506 IC1D.1@90.469,47.506
NetIC1D_2: IC1D.2 RN1D.2 RN1D.3 | length 15.2
  L1 w0.203: v1(80.769,48.155) 80.769,46.477 RN1D.2@80.788,46.457 ; v1(82.044,48.18) 82.058,48.166 RN1D.3@82.058,46.457 ; IC1D.2@91.119,46.909 v1(91.119,48.205)
  L3 w0.203: v1(80.769,48.155) 82.044,48.155 82.048,48.151 88.014,48.151 88.171,48.309 88.567,48.309 88.699,48.177 91.091,48.177 v1(91.119,48.205)
NetIC1D_6: IC1D.6 RN2D.2 RN2D.3 | length 11.1
  L1 w0.203: RN2D.3@86.294,51.855 86.294,50.29 86.429,50.155 87.179,50.155 ; RN2D.2@87.564,51.855 87.429,51.72 87.429,50.405 87.179,50.155 ; IC1D.6@91.769,51.309 91.769,49.934 91.444,49.609 90.965,49.609 90.891,49.535 90.757,49.535 90.377,49.155 88.179,49.155 87.179,50.155
NetIC1D_7: IC1D.7 R12D.1 RN2D.6 | length 13
  L1 w0.203: RN2D.6@86.294,46.455 86.294,48.52 v1(86.429,48.655) ; v1(89.179,49.905) 90.794,49.905 91.119,50.23 91.119,52.48 v1(91.094,52.505) ; v1(93.219,52.58) 93.315,52.676 R12D.1@94.103,52.676
  L3 w0.203: v1(86.429,48.655) 87.929,48.655 v1(89.179,49.905) ; v1(91.094,52.505) 93.144,52.505 v1(93.219,52.58)
NetIC1E_1: IC1E.1 R6E.1 RN1E.7 RN2E.7 | length 19.7
  L1 w0.203: RN1E.7@80.788,41.857 80.788,40.611 82.059,39.34 86.495,39.34 87.564,38.27 ; RN2E.7@87.564,36.455 87.564,38.27 ; IC1E.1@90.469,36.909 IC1E.1@90.469,37.506 ; R6E.1@94.103,37.486 93.573,37.486 93.353,37.706 93.293,37.706 92.315,38.684 90.921,38.684 90.469,38.232 IC1E.1@90.469,37.506 ; 87.564,38.27 87.603,38.309 88.567,38.309 89.165,37.711 89.165,37.67 89.329,37.506 IC1E.1@90.469,37.506
NetIC1E_2: IC1E.2 RN1E.2 RN1E.3 | length 15.2
  L1 w0.203: v1(80.769,38.155) 80.769,36.477 RN1E.2@80.788,36.457 ; RN1E.3@82.058,36.457 82.058,38.169 v1(82.094,38.205) ; IC1E.2@91.119,36.909 v1(91.119,38.205)
  L3 w0.203: v1(80.769,38.155) 80.819,38.205 88.067,38.205 88.171,38.309 88.567,38.309 88.699,38.177 91.091,38.177 v1(91.119,38.205)
NetIC1E_6: IC1E.6 RN2E.2 RN2E.3 | length 11.1
  L1 w0.203: RN2E.3@86.294,41.855 86.294,40.29 86.429,40.155 87.179,40.155 ; RN2E.2@87.564,41.855 87.429,41.72 87.429,40.405 87.179,40.155 ; IC1E.6@91.769,41.309 91.769,39.934 91.444,39.609 90.965,39.609 90.891,39.535 90.757,39.535 90.377,39.155 88.179,39.155 87.179,40.155
NetIC1E_7: IC1E.7 R12E.1 RN2E.6 | length 13
  L1 w0.203: RN2E.6@86.294,36.455 86.294,38.027 86.396,38.129 86.396,38.65 v1(86.429,38.684) ; v1(89.179,39.905) 90.794,39.905 91.119,40.23 91.119,42.48 v1(91.094,42.505) ; v1(93.219,42.58) 93.315,42.676 R12E.1@94.103,42.676
  L3 w0.203: v1(86.429,38.684) 86.458,38.655 87.929,38.655 v1(89.179,39.905) ; v1(91.094,42.505) 93.144,42.505 v1(93.219,42.58)
NetIC1F_1: IC1F.1 R6F.1 RN1F.7 RN2F.7 | length 19.7
  L1 w0.203: RN1F.7@80.788,31.857 80.788,30.611 82.089,29.31 86.525,29.31 87.564,28.27 ; RN2F.7@87.564,26.455 87.564,28.27 ; IC1F.1@90.469,26.909 IC1F.1@90.469,27.506 ; R6F.1@94.103,27.486 93.573,27.486 93.353,27.706 93.293,27.706 92.315,28.684 90.921,28.684 90.469,28.232 IC1F.1@90.469,27.506 ; 87.564,28.27 87.603,28.309 88.567,28.309 89.165,27.711 89.165,27.67 89.329,27.506 IC1F.1@90.469,27.506
NetIC1F_2: IC1F.2 RN1F.2 RN1F.3 | length 15.2
  L1 w0.203: v1(80.769,28.155) 80.769,26.477 RN1F.2@80.788,26.457 ; RN1F.3@82.058,26.457 82.058,28.144 v1(82.094,28.18) ; IC1F.2@91.119,26.909 v1(91.119,28.205)
  L3 w0.203: v1(80.769,28.155) v1@82.094,28.155 ; v1@82.095,28.154 82.45,28.154 82.453,28.151 88.014,28.151 88.171,28.309 88.567,28.309 88.699,28.177 91.091,28.177 v1(91.119,28.205)
NetIC1F_6: IC1F.6 RN2F.2 RN2F.3 | length 11.1
  L1 w0.203: RN2F.3@86.294,31.855 86.294,30.29 86.429,30.155 87.179,30.155 ; RN2F.2@87.564,31.855 87.429,31.72 87.429,30.405 87.179,30.155 ; IC1F.6@91.769,31.309 91.769,29.934 91.444,29.609 90.965,29.609 90.891,29.535 90.757,29.535 90.377,29.155 88.179,29.155 87.179,30.155
NetIC1F_7: IC1F.7 R12F.1 RN2F.6 | length 13
  L1 w0.203: RN2F.6@86.294,26.455 86.294,28.52 v1(86.429,28.655) ; v1(89.179,29.905) 90.794,29.905 91.119,30.23 IC1F.7@91.119,31.309 91.119,32.48 v1(91.094,32.505) ; v1(93.219,32.58) 93.315,32.676 R12F.1@94.103,32.676
  L3 w0.203: v1(86.429,28.655) 87.929,28.655 v1(89.179,29.905) ; v1(91.094,32.505) 93.144,32.505 v1(93.219,32.58)
NetIC1G_1: IC1G.1 R6G.1 RN1G.7 RN2G.7 | length 19.7
  L1 w0.203: RN1G.7@80.788,21.857 80.788,20.611 82.087,19.312 86.523,19.312 87.564,18.27 ; RN2G.7@87.564,16.455 87.564,18.27 ; IC1G.1@90.469,16.909 IC1G.1@90.469,17.506 ; R6G.1@94.103,17.486 93.573,17.486 93.353,17.706 93.293,17.706 92.315,18.684 90.921,18.684 90.469,18.232 IC1G.1@90.469,17.506 ; 87.564,18.27 87.603,18.309 88.567,18.309 89.165,17.711 89.165,17.67 89.329,17.506 IC1G.1@90.469,17.506
NetIC1G_2: IC1G.2 RN1G.2 RN1G.3 | length 15.2
  L1 w0.203: v1(80.769,18.155) 80.798,18.126 80.798,17.207 80.769,17.178 80.769,16.477 RN1G.2@80.788,16.457 ; RN1G.3@82.058,16.457 82.058,18.116 v1(82.094,18.151) ; IC1G.2@91.119,16.909 v1(91.119,18.205)
  L3 w0.203: v1@80.773,18.151 88.014,18.151 88.171,18.309 88.567,18.309 88.699,18.177 91.091,18.177 v1(91.119,18.205)
NetIC1G_6: IC1G.6 RN2G.2 RN2G.3 | length 11.1
  L1 w0.203: RN2G.3@86.294,21.855 86.294,20.29 86.429,20.155 87.179,20.155 ; RN2G.2@87.564,21.855 87.429,21.72 87.429,20.405 87.179,20.155 ; IC1G.6@91.769,21.309 91.769,19.934 91.444,19.609 90.965,19.609 90.891,19.535 90.757,19.535 90.377,19.155 88.179,19.155 87.179,20.155
NetIC1G_7: IC1G.7 R12G.1 RN2G.6 | length 13
  L1 w0.203: RN2G.6@86.294,16.455 86.294,18.52 v1(86.429,18.655) ; v1(89.179,19.905) 90.794,19.905 91.119,20.23 91.119,22.48 v1(91.094,22.505) ; v1(93.219,22.58) 93.315,22.676 R12G.1@94.103,22.676
  L3 w0.203: v1(86.429,18.655) 87.929,18.655 v1(89.179,19.905) ; v1(91.094,22.505) 93.144,22.505 v1(93.219,22.58)
NetIC1H_1: IC1H.1 R6H.1 RN1H.7 RN2H.7 | length 19.7
  L1 w0.203: RN1H.7@80.788,11.857 80.788,10.611 82.115,9.284 86.55,9.284 87.564,8.27 ; RN2H.7@87.564,6.455 87.564,8.27 ; IC1H.1@90.469,6.909 IC1H.1@90.469,7.506 ; R6H.1@94.103,7.486 93.573,7.486 93.353,7.706 93.293,7.706 92.315,8.684 90.921,8.684 90.469,8.232 IC1H.1@90.469,7.506 ; 87.564,8.27 87.603,8.309 88.567,8.309 89.165,7.711 89.165,7.67 89.329,7.506 IC1H.1@90.469,7.506
NetIC1H_2: IC1H.2 RN1H.2 RN1H.3 | length 15.2
  L1 w0.203: v1(80.769,8.155) 80.769,6.477 RN1H.2@80.788,6.457 ; RN1H.3@82.058,6.457 82.058,8.091 v1(82.119,8.151) ; IC1H.2@91.119,6.909 v1(91.119,8.205)
  L3 w0.203: v1(80.769,8.155) 82.115,8.155 v1(82.119,8.151) 88.014,8.151 88.171,8.309 88.567,8.309 88.699,8.177 91.091,8.177 v1(91.119,8.205)
NetIC1H_6: IC1H.6 RN2H.2 RN2H.3 | length 11.1
  L1 w0.203: RN2H.3@86.294,11.855 86.294,10.29 86.429,10.155 87.179,10.155 ; RN2H.2@87.564,11.855 87.429,11.72 87.429,10.405 87.179,10.155 ; IC1H.6@91.769,11.309 91.769,9.934 91.444,9.609 90.965,9.609 90.891,9.535 90.757,9.535 90.377,9.155 88.179,9.155 87.179,10.155
NetIC1H_7: IC1H.7 R12H.1 RN2H.6 | length 13
  L1 w0.203: RN2H.6@86.294,6.455 86.294,8.52 v1(86.429,8.655) ; v1(89.179,9.905) 90.794,9.905 91.119,10.23 91.119,12.48 v1(91.094,12.505) ; v1(93.219,12.58) 93.315,12.676 R12H.1@94.103,12.676
  L3 w0.203: v1(86.429,8.655) 87.929,8.655 v1(89.179,9.905) ; v1(91.094,12.505) 93.144,12.505 v1(93.219,12.58)
NetIC2A_7: IC2A.7 RN1A.1 | length 9.2
  L1 w0.203: IC2A.7@77.275,81.967 77.275,82.815 77.605,83.145 78.223,83.145 78.575,82.793 78.575,79.11 79.518,78.167 RN1A.1@79.518,76.457
NetIC2B_7: IC2B.7 RN1B.1 | length 9.2
  L1 w0.203: IC2B.7@77.275,71.967 77.275,72.815 77.605,73.145 78.223,73.145 78.575,72.793 78.575,69.11 79.518,68.167 RN1B.1@79.518,66.457
NetIC2C_7: IC2C.7 RN1C.1 | length 9.2
  L1 w0.203: IC2C.7@77.288,61.923 77.288,62.771 77.618,63.101 78.236,63.101 78.588,62.749 78.588,59.066 79.531,58.123 RN1C.1@79.531,56.413
NetIC2D_7: IC2D.7 RN1D.1 | length 9.2
  L1 w0.203: IC2D.7@77.275,51.967 77.275,52.815 77.605,53.145 78.223,53.145 78.575,52.793 78.575,49.11 79.518,48.167 RN1D.1@79.518,46.457
NetIC2E_7: IC2E.7 RN1E.1 | length 9.2
  L1 w0.203: IC2E.7@77.275,41.967 77.275,42.815 77.605,43.145 78.223,43.145 78.575,42.793 78.575,39.11 79.518,38.167 RN1E.1@79.518,36.457
NetIC2F_7: IC2F.7 RN1F.1 | length 9.2
  L1 w0.203: IC2F.7@77.275,31.967 77.275,32.815 77.605,33.145 78.223,33.145 78.575,32.793 78.575,29.11 79.518,28.167 RN1F.1@79.518,26.457
NetIC2G_7: IC2G.7 RN1G.1 | length 9.2
  L1 w0.203: IC2G.7@77.275,21.967 77.275,22.815 77.605,23.145 78.223,23.145 78.575,22.793 78.575,19.11 79.518,18.167 RN1G.1@79.518,16.457
NetIC2H_7: IC2H.7 RN1H.1 | length 9.2
  L1 w0.203: IC2H.7@77.275,11.967 77.275,12.815 77.605,13.145 78.223,13.145 78.575,12.793 78.575,9.11 79.518,8.167 RN1H.1@79.518,6.457
NetIC18A_1: IC18A.1 R25A.1 | length 3.2
  L1 w0.25: R25A.1@45.7,85.1 46.855,83.945 47.795,83.945 48.07,83.67 IC18A.1@48.07,83.47
NetIC18A_6: IC18A.6 R5A.1 SW1A.4 | length 11.5
  L1 w0.762: SW1A.4@43.086,81.59 46.285,81.59 48.07,79.805 48.07,78.105 IC18A.6@48.07,77.17 ; IC18A.6@48.089,77.22 R5A.1@51.194,77.22
NetIC18B_1: IC18B.1 R25B.1 | length 3.2
  L1 w0.25: R25B.1@45.7,75.1 46.855,73.945 47.795,73.945 48.07,73.67 IC18B.1@48.07,73.47
NetIC18B_6: IC18B.6 R5B.1 SW1B.4 | length 11.5
  L1 w0.762: SW1B.4@43.086,71.59 46.285,71.59 48.07,69.805 48.07,68.105 IC18B.6@48.07,67.17 ; IC18B.6@48.089,67.22 R5B.1@51.194,67.22
NetIC18C_1: IC18C.1 R25C.1 | length 3.2
  L1 w0.25: R25C.1@45.713,65.1 46.867,63.945 47.807,63.945 48.082,63.67 IC18C.1@48.082,63.47
NetIC18C_6: IC18C.6 R5C.1 SW1C.4 | length 11.5
  L1 w0.762: SW1C.4@43.099,61.59 46.298,61.59 48.082,59.805 48.082,58.105 IC18C.6@48.082,57.17 ; IC18C.6@48.101,57.22 R5C.1@51.207,57.22
NetIC18D_1: IC18D.1 R25D.1 | length 3.2
  L1 w0.25: R25D.1@45.7,55.1 46.855,53.945 47.795,53.945 48.07,53.67 IC18D.1@48.07,53.47
NetIC18D_6: IC18D.6 R5D.1 SW1D.4 | length 11.5
  L1 w0.762: SW1D.4@43.086,51.59 46.285,51.59 48.07,49.805 48.07,48.105 IC18D.6@48.07,47.17 ; IC18D.6@48.089,47.22 R5D.1@51.194,47.22
NetIC18E_1: IC18E.1 R25E.1 | length 3.2
  L1 w0.25: R25E.1@45.7,45.1 46.855,43.945 47.795,43.945 48.07,43.67 IC18E.1@48.07,43.47
NetIC18E_6: IC18E.6 R5E.1 SW1E.4 | length 11.5
  L1 w0.762: SW1E.4@43.086,41.59 46.285,41.59 48.07,39.805 48.07,38.105 IC18E.6@48.07,37.17 ; IC18E.6@48.089,37.22 R5E.1@51.194,37.22
NetIC18F_1: IC18F.1 R25F.1 | length 3.2
  L1 w0.25: R25F.1@45.7,35.1 46.855,33.945 47.795,33.945 48.07,33.67 IC18F.1@48.07,33.47
NetIC18F_6: IC18F.6 R5F.1 SW1F.4 | length 11.5
  L1 w0.762: SW1F.4@43.086,31.59 46.285,31.59 48.07,29.805 48.07,28.105 IC18F.6@48.07,27.17 ; IC18F.6@48.089,27.22 R5F.1@51.194,27.22
NetIC18G_1: IC18G.1 R25G.1 | length 3.2
  L1 w0.25: R25G.1@45.7,25.1 46.855,23.945 47.795,23.945 48.07,23.67 IC18G.1@48.07,23.47
NetIC18G_6: IC18G.6 R5G.1 SW1G.4 | length 11.5
  L1 w0.762: SW1G.4@43.086,21.59 46.285,21.59 48.07,19.805 48.07,18.105 IC18G.6@48.07,17.17 ; IC18G.6@48.089,17.22 R5G.1@51.194,17.22
NetIC18H_1: IC18H.1 R25H.1 | length 3.2
  L1 w0.25: R25H.1@45.7,15.1 46.855,13.945 47.795,13.945 48.07,13.67 IC18H.1@48.07,13.47
NetIC18H_6: IC18H.6 R5H.1 SW1H.4 | length 11.5
  L1 w0.762: SW1H.4@43.086,11.59 46.285,11.59 48.07,9.805 48.07,8.105 IC18H.6@48.07,7.17 ; IC18H.6@48.089,7.22 R5H.1@51.194,7.22
NetIC19_9: IC19.9 IC20.14 | length 79.9
  L1 w0.127: IC20.14@105.899,9.737 v1(107.001,9.737) ; IC19.9@105.899,74.95 v1(107.001,74.95)
  L4 w0.152: v1(107.001,9.737) 107.321,10.056 110.177,10.056 115.269,15.148 115.269,18.32 113.52,20.069 109.561,20.069 107.399,22.232 107.399,27.743 105.807,29.335 105.807,34.118 105.75,34.175 105.75,40.9 105.975,41.125 105.975,44.3 106.394,44.719 106.394,58.866 106.575,59.047 106.575,59.59 106.416,59.749 106.416,61.363 107.538,62.485 107.538,74.413 v1(107.001,74.95)
NetIC21_2: IC21.2 R51.1 R52.2 | length 3.4
  L1 w0.25: R51.1@117.493,49.069 117.724,48.838 IC21.2@120.834,48.838
NetIC22_4: IC22.4 IC23.4 R54.1 R55.2 | length 7.6
  L1 w0.152: R54.1@120.144,16.35 120.477,16.683 120.477,17.363 R55.2@120.614,17.5 120.614,17.482 120.828,17.268 121.281,17.268 121.37,17.268 121.569,17.069 122.079,17.069 122.278,16.87 122.278,15.993 122.763,15.508 122.763,13.738 122.594,13.569 IC23.4@121.894,13.569
NetIC24_3: IC24.3 IC26.4 R61.1 R63.2 | length 9.3
  L1 w0.25: v1(119.361,21.11) IC24.3@120.012,21.11
  L1 w0.254: R63.2@118.5,27.5 R61.1@118.5,26.025 118.578,25.947 IC26.4@119.987,25.947 120.262,25.947 120.41,25.799 v1(120.41,24.742)
  L4 w0.25: v1(119.361,21.11) 119.361,23.693 v1(120.41,24.742)
NetIC25_2: IC25.2 R57.2 | length 4.2
  L1 w0.203: IC25.2@152.154,80.405 153.709,78.85 R57.2@155.694,78.85
NetIC25_6: IC25.6 R56.1 R58.2 | length 6.7
  L1 w0.203: R58.2@126.813,74.099 126.813,72.311 126.944,72.18 128.055,72.18 129.294,73.419 IC25.6@129.294,75.325
NetIC27_2: IC27.2 R60.1 | length 4.2
  L1 w0.152: IC27.2@133.921,15.192 133.921,16.146 134.125,16.35 135.369,16.35 136.011,16.992 R60.1@136.011,17.772
NetIC28_5: IC28.5 R66.1 R68.2 | length 3.4
  L1 w0.305: R68.2@141.141,60.82 142.391,59.57 R66.1@142.641,59.57 ; R68.2@141.142,61.069 IC28.5@141.142,62.415
NetIC28_9: IC28.9 L7.1 | length 3.3
  L1 w0.33: IC28.9@143.242,63.915 145.245,63.915 L7.1@146.165,64.835
NetIC29_4: IC29.4 IC30.4 R70.1 R71.2 | length 8.3
  L1 w0.152: R71.2@116.02,45 117.45,45 R70.1@117.65,44.8 117.9,44.55 IC29.4@119.4,44.55 119.585,44.55 119.784,44.351 119.784,43.474 120.269,42.989 120.269,41.219 120.1,41.05 IC30.4@119.4,41.05
NetIC31_5: IC31.5 R72.1 R74.2 | length 2.4
  L1 w0.127: IC31.5@137.691,61.02 138.421,61.02 R72.1@138.921,60.52 R74.2@138.921,61.52
NetIC31_9: IC31.9 L9.1 | length 4.7
  L1 w0.127: L9.1@132.313,60.295 L9.1@133.002,59.606
  L1 w0.254: L9.1@132.313,60.545 133.063,60.545 133.936,59.672 133.936,59.669 134.085,59.52 IC31.9@135.591,59.52
NetIC32_2: IC32.2 R73.1 R75.2 | length 2.7
  L1 w0.25: R73.1@122.1,31.364 R75.2@123.046,31.364 123.175,31.493 123.548,31.493 123.809,31.754 124.421,31.754 IC32.2@124.596,31.929
NetIC35_2: IC35.2 R83.1 RN3.6 | length 14.9
  L1 w0.3: IC35.2@102.175,58.075 100.975,58.075 99.474,56.574 99.474,53.375 99.774,53.075 99.85,53.075 100.65,52.275 103.625,52.275 104.26,51.64 RN3.6@107.125,51.64
NetIC35_6: IC35.6 RN3.7 | length 7
  L1 w0.3: IC35.6@106.575,57.425 105.557,57.425 105.381,57.249 105.381,53.534 106.005,52.91 RN3.7@107.125,52.91
NetIC36_23: IC36.23 R76.2 T9.3 | length 50.2
  L1 w0.127: IC36.23@105.364,33.49 105.364,32.625 105.839,32.15 106.182,32.15 106.485,31.847 106.485,29.965 106.75,29.7 v1(106.763,29.7)
  L1 w0.15: v1(108.475,26.275) 108.475,22.7 109.55,21.625 112.075,21.625 112.5,22.05 112.5,26.625 114.425,28.55 116.25,28.55 116.496,28.796 117.404,28.796 117.75,28.45 123.025,28.45 123.402,28.827 125.502,28.827 125.724,29.049 125.724,33.466 125.19,34 120.625,34 119.6,35.025 T9.3@119.6,35.65 119.55,35.6 118.913,35.6 118.825,35.512 118.825,34.925 118.675,34.775 118.025,34.775 R76.2@118,34.8
  L4 w0.127: v1(106.763,29.7) 106.802,29.7 108.475,28.027 v1(108.475,26.275)
NetIC36_25: IC36.25 R77.2 | length 2.7
  L1 w0.254: IC36.25@106.364,33.49 106.364,32.923 106.882,32.405 106.884,32.405 107.321,31.968 107.321,31.728 107.644,31.405 R77.2@107.694,31.405
NetIC36_43: IC36.43 R78.1 | length 2.4
  L1 w0.254: IC36.43@105.864,41.34 105.864,42.553 106.504,43.193 106.504,43.258 106.65,43.404 R78.1@106.695,43.404
NetL1A_3: L1A.3 R8A.2 R9A.1 | length 6.1
  L1 w0.203: R8A.2@59.064,78.288 59.064,79.113 59.255,79.304 L1A.3@61.76,79.304 62.336,79.88 63.42,79.88 R9A.1@63.852,80.312
NetL1A_4: L1A.4 R1A.2 R2A.1 | length 5.7
  L1 w0.203: R1A.2@59.064,82.86 59.064,82.029 59.249,81.844 L1A.4@61.76,81.844 63.768,81.844 R2A.1@63.852,81.76
NetL1B_3: L1B.3 R8B.2 R9B.1 | length 6.1
  L1 w0.203: R8B.2@59.064,68.288 59.064,69.113 59.255,69.304 L1B.3@61.76,69.304 62.336,69.88 63.42,69.88 R9B.1@63.852,70.312
NetL1B_4: L1B.4 R1B.2 R2B.1 | length 5.7
  L1 w0.203: R1B.2@59.064,72.86 59.064,72.029 59.249,71.844 L1B.4@61.76,71.844 63.768,71.844 R2B.1@63.852,71.76
NetL1C_3: L1C.3 R8C.2 R9C.1 | length 6.1
  L1 w0.203: R8C.2@59.077,58.244 59.077,59.069 59.267,59.26 L1C.3@61.773,59.26 62.349,59.836 63.433,59.836 R9C.1@63.865,60.268
NetL1C_4: L1C.4 R1C.2 R2C.1 | length 5.7
  L1 w0.203: R1C.2@59.077,62.816 59.077,61.985 59.262,61.8 L1C.4@61.773,61.8 63.781,61.8 R2C.1@63.865,61.716
NetL1D_3: L1D.3 R8D.2 R9D.1 | length 6.1
  L1 w0.203: R8D.2@59.064,48.288 59.064,49.113 59.255,49.304 L1D.3@61.76,49.304 62.336,49.88 63.42,49.88 R9D.1@63.852,50.312
NetL1D_4: L1D.4 R1D.2 R2D.1 | length 5.7
  L1 w0.203: R1D.2@59.064,52.86 59.064,52.029 59.249,51.844 L1D.4@61.76,51.844 63.768,51.844 R2D.1@63.852,51.76
NetL1E_3: L1E.3 R8E.2 R9E.1 | length 6.1
  L1 w0.203: R8E.2@59.064,38.288 59.064,39.113 59.255,39.304 L1E.3@61.76,39.304 62.336,39.88 63.42,39.88 R9E.1@63.852,40.312
NetL1E_4: L1E.4 R1E.2 R2E.1 | length 5.7
  L1 w0.203: R1E.2@59.064,42.86 59.064,42.029 59.249,41.844 L1E.4@61.76,41.844 63.768,41.844 R2E.1@63.852,41.76
NetL1F_3: L1F.3 R8F.2 R9F.1 | length 6.1
  L1 w0.203: R8F.2@59.064,28.288 59.064,29.113 59.255,29.304 L1F.3@61.76,29.304 62.336,29.88 63.42,29.88 R9F.1@63.852,30.312
NetL1F_4: L1F.4 R1F.2 R2F.1 | length 5.7
  L1 w0.203: R1F.2@59.064,32.86 59.064,32.029 59.249,31.844 L1F.4@61.76,31.844 63.768,31.844 R2F.1@63.852,31.76